# Altium PCB ISEPIC Cartridge for C64.PcbDoc
Units mm, origin at the board's own origin, x right, y up, seen from the top; angles counter-clockwise.
Board outline 61.22 x 83.18 mm, 2 copper layers (Top Layer, Bottom Layer), stack 1.569 mm thick; 23 components, 53 nets, 198 pads, 91 vias.
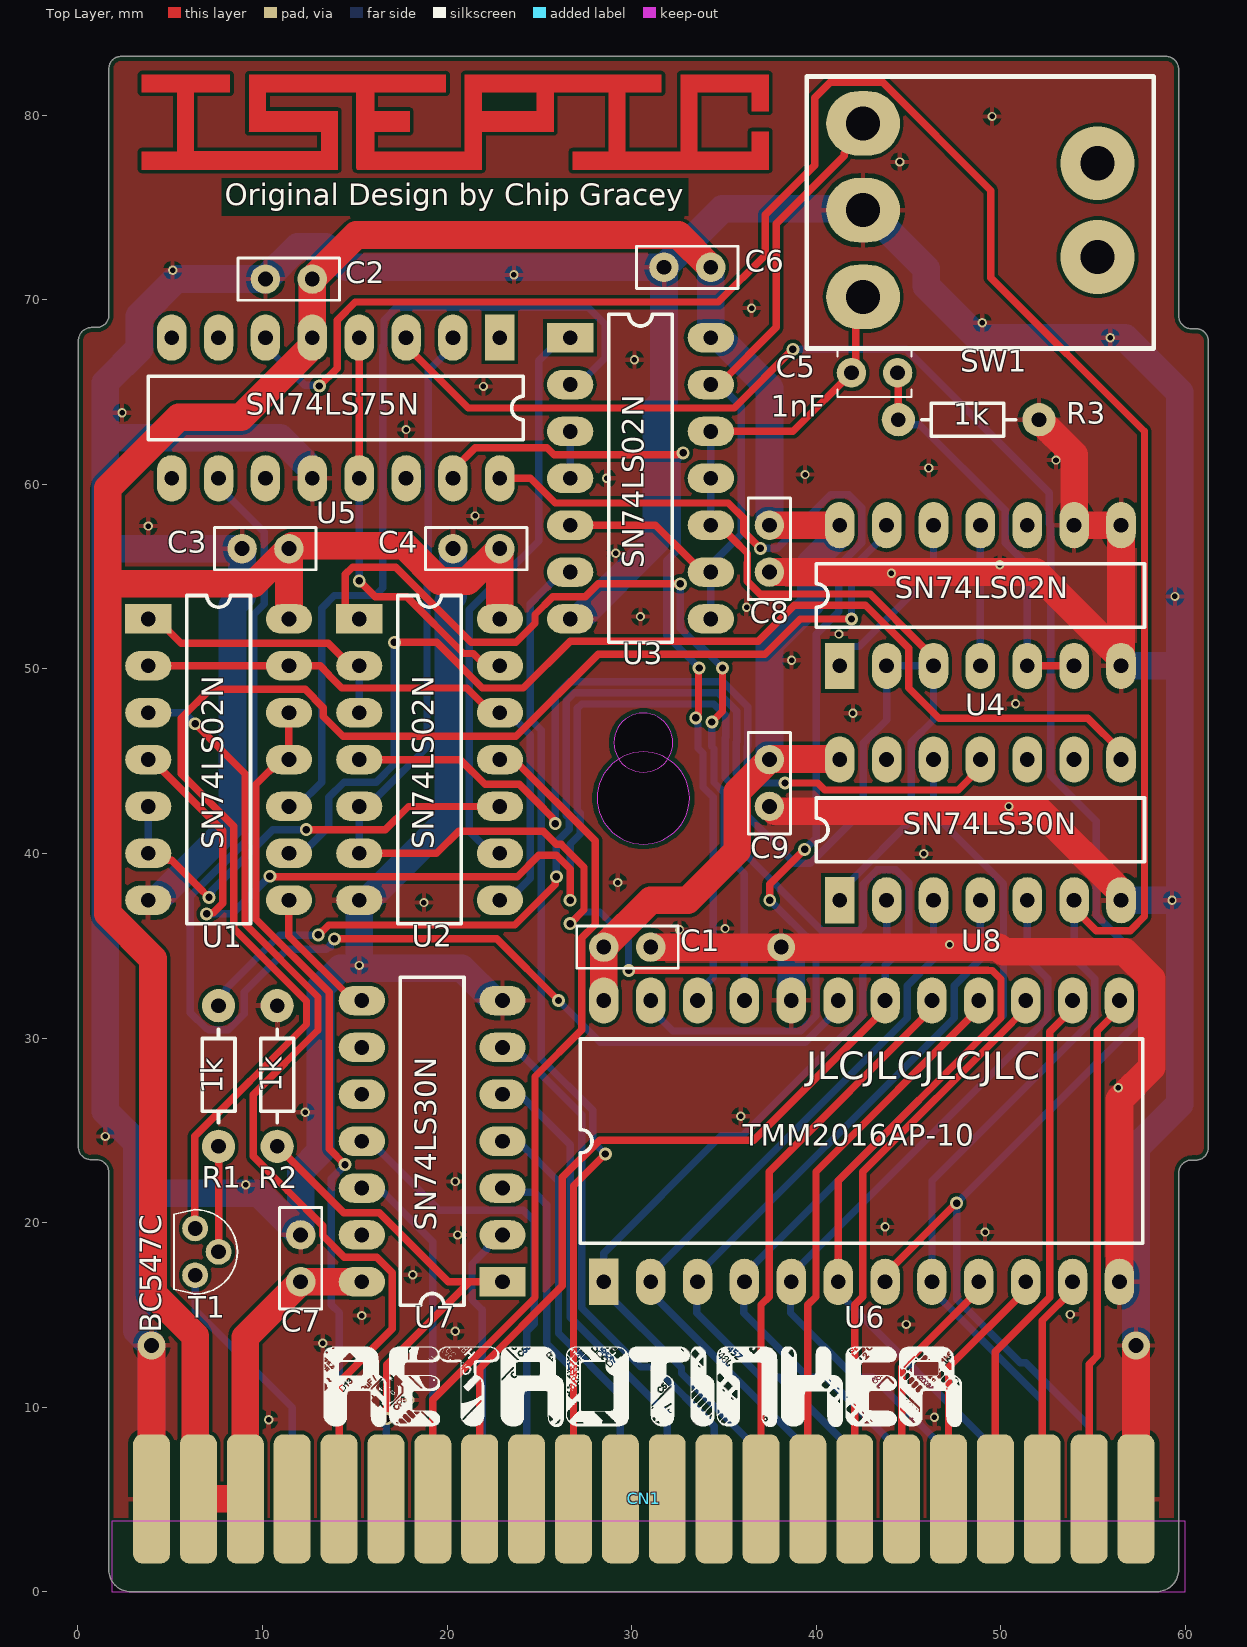
[diagram p0: Top Layer view]
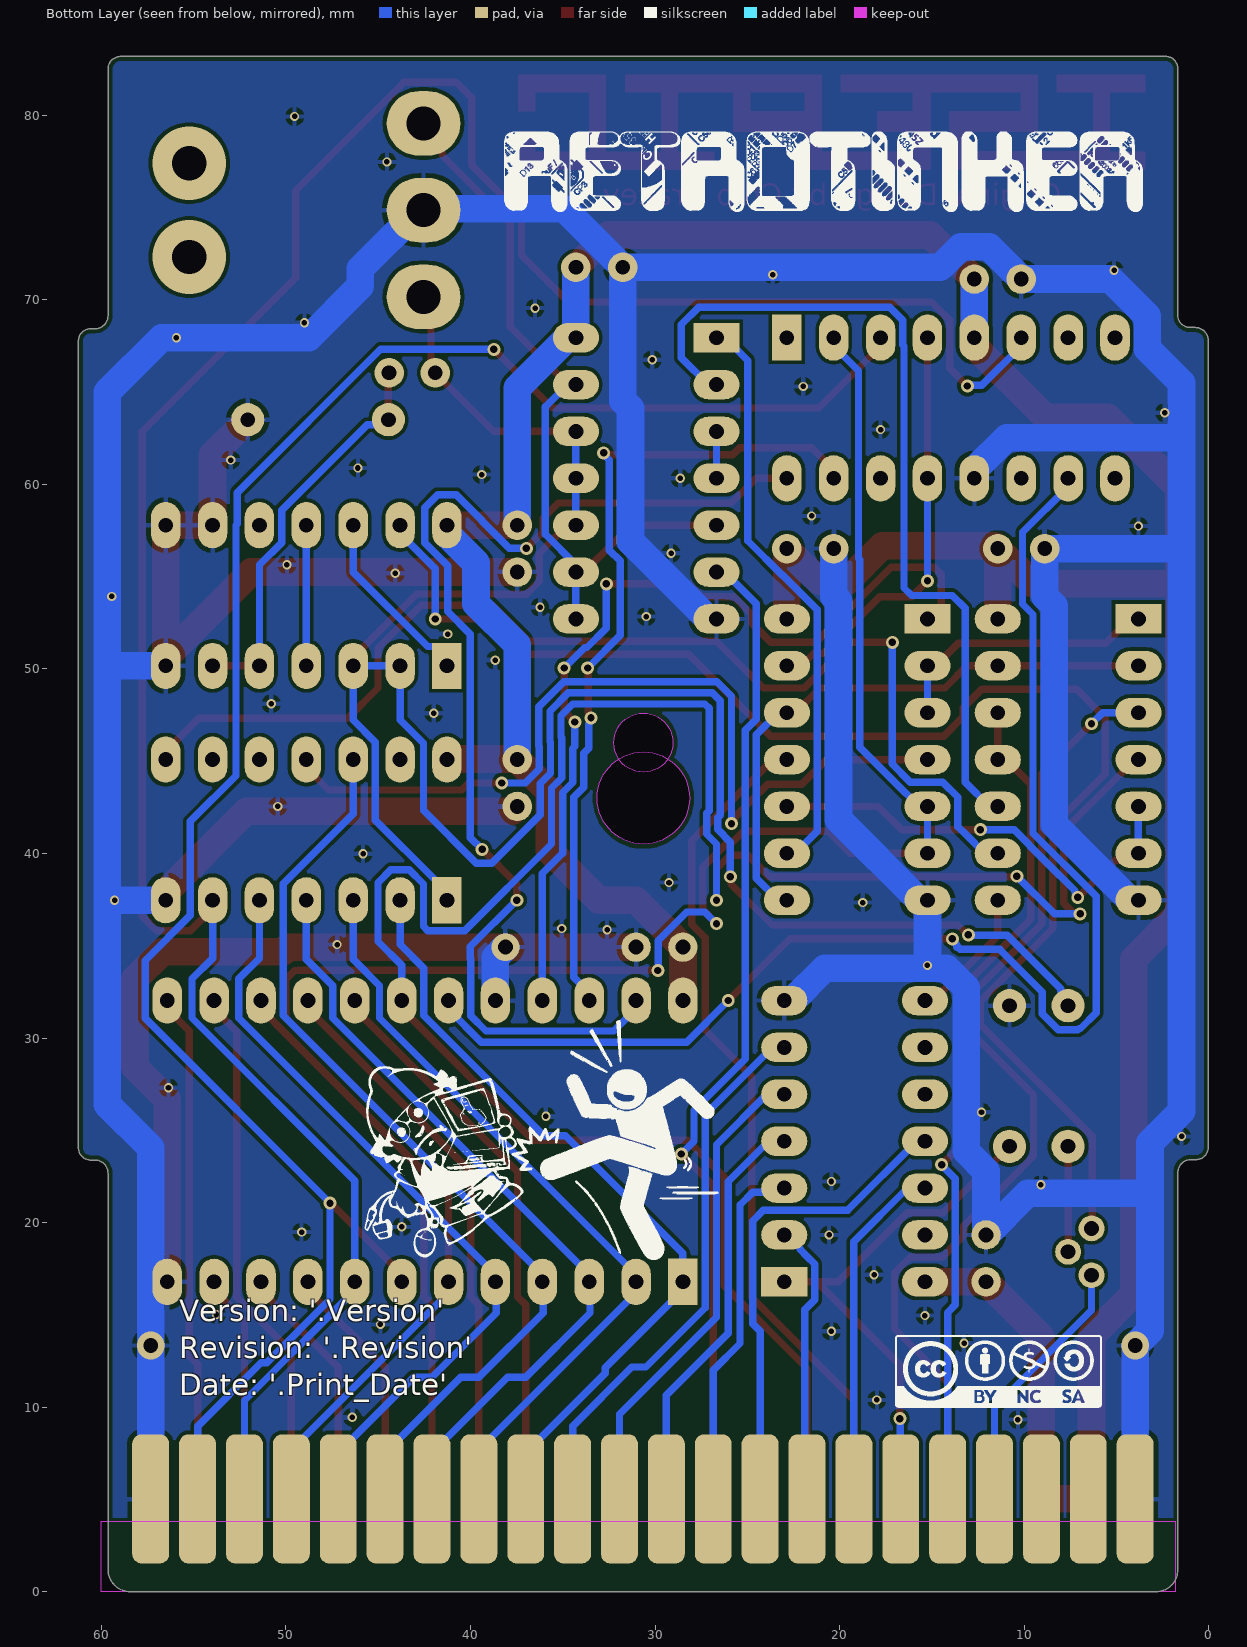
[diagram p1: Bottom Layer view, seen from below]
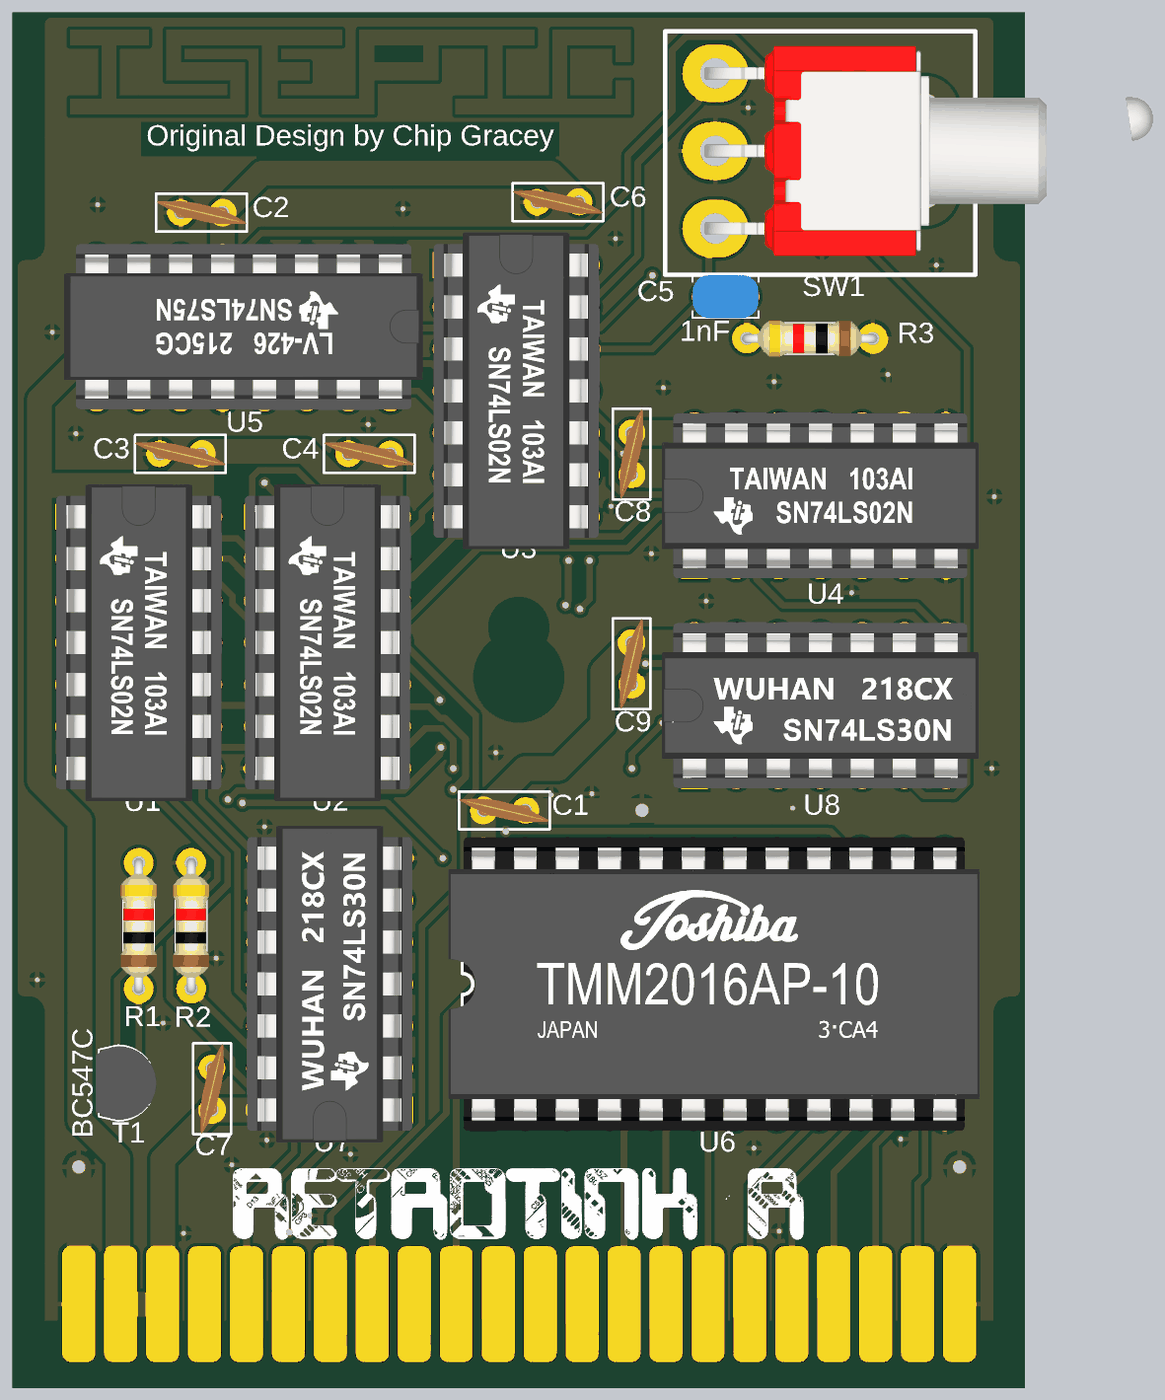
[diagram p2: 3D render of the assembled board from above, using the file's embedded part models]

## Layer stack, top to bottom
Top Solder: solder mask 0.0254, SM-001, Dk 4
Top Layer: signal copper 0.035
Dielectric 1: core 1.4986, Core-043, Dk 4.3
Bottom Layer: signal copper 0.035
Bottom Solder: solder mask 0.0254, SM-001, Dk 4

## Board outline
0.691,23.413 0.967,23.413 cw(c0.967,22.704) 1.676,22.704 1.676,1.173 ccw(c2.845,1.173) 2.845,0.005 58.446,0.005 ccw(c58.446,1.198) 59.639,1.198 59.639,22.678 cw(c60.348,22.678) 60.348,23.387 60.578,23.387 ccw(c60.578,24.054) 61.245,24.054 61.245,67.763 ccw(c60.578,67.763) 60.578,68.43 60.348,68.43 cw(c60.348,69.139) 59.639,69.139 59.639,82.499 ccw(c58.953,82.499) 58.953,83.185 2.337,83.185 ccw(c2.337,82.525) 1.676,82.525 1.676,69.164 cw(c1.01,69.164) 1.01,68.498 0.734,68.498 ccw(c0.734,67.789) 0.024,67.789 0.024,24.079 ccw(c0.691,24.079)
cut-out: 29.034,46.002 ccw(c30.635,46.002) 30.635,44.402 ccw(c30.635,46.002) 32.235,46.002 ccw(c30.635,46.002) 30.635,47.602 ccw(c30.635,46.002)
cut-out: 28.134,43.002 ccw(c30.635,43.002) 30.635,40.502 ccw(c30.635,43.002) 33.135,43.002 ccw(c30.635,43.002) 30.635,45.503 ccw(c30.635,43.002)

## Design rules (kind name [scope] priority, off if disabled: settings)
BoardOutlineClearance [All] p1: gap=0.254 ignorepadtopadclearanceinfootprint=FALSE
Clearance [All] p1: gap=0.2 ignorepadtopadclearanceinfootprint=TRUE
ComponentClearance ComponentClearance_Sheet [HasFootprint('PCB Title Block DIN A4')] p1: gap=0 collisioncheckmode=3 verticalgap=0 showdistances=FALSE
ComponentClearance [All] p2: gap=0.254 collisioncheckmode=3 verticalgap=0.254 showdistances=FALSE
MinimumSolderMaskSliver [All] p1: minsoldermaskwidth=0.103
PolygonConnect [All] p1: connectstyle=Relief reliefconductorwidth=0.254 reliefentries=4 polygonreliefangle="90 Angle" airgapwidth=0.254
RoutingVias RoutingVias_Power [(InNet('VCC') OR InNet('GND') OR InNet('+5V'))] p1: holewidth=0.8 width=1.5 viastyle="Through Hole" minholewidth=0.5 minwidth=1 maxholewidth=0.8 maxwidth=1.5
RoutingVias [All] p2: holewidth=0.4 width=0.7 viastyle="Through Hole" minholewidth=0.3 minwidth=0.6 maxholewidth=0.5 maxwidth=0.8
SilkToSilkClearance [All] p1: silktosilkclearance=0
SilkToSolderMaskClearance [IsPad] p1: minsilkscreentomaskgap=0.2 clearancetoexposedcopper=TRUE
SolderMaskExpansion [All] p1: expansion=0.038 istentingtop=FALSE
UnRoutedNet [All] p1: checkbadconnections=TRUE
Width Width_Power [(InNet('VCC') OR InNet('GND') OR InNet('+5V'))] p1: maxlimit=1.5 minlimit=1 preferedwidth=1.5
Width [All] p2: maxlimit=0.6 minlimit=0.3 preferedwidth=0.4
25 further rules are at their usual default settings.

## Classes and differential pairs
net class D[0..7]: D0 D1 D2 D3 D4 D5 D6 D7
net class A[0..15]: A0 A1 A2 A3 A4 A5 A6 A7 A8 A9 A10 A11 A12 A13 A14 A15

## Components (designator, comment, footprint, x,y, rotation, side; value= is the part's Value field where it differs from the comment)
C1 "100nF" "CAP Disc 100nF P2.54mm D5.5mm T3mm" 31.031,34.925 r180 top
C2 "100nF" "CAP Disc 100nF P2.54mm D5.5mm T3mm" 10.16,71.12 r0 top
C3 "100nF" "CAP Disc 100nF P2.54mm D5.5mm T3mm" 8.89,56.515 r0 top
C4 "100nF" "CAP Disc 100nF P2.54mm D5.5mm T3mm" 20.32,56.515 r0 top
C5 "1nF" K102J15C0GF5TL2 41.91,66.04 r0 top
C6 "100nF" "CAP Disc 100nF P2.54mm D5.5mm T3mm" 31.75,71.755 r0 top
C7 "100nF" "CAP Disc 100nF P2.54mm D5.5mm T3mm" 12.065,19.329 r270 top
C8 "100nF" "CAP Disc 100nF P2.54mm D5.5mm T3mm" 37.465,55.245 r90 top
C9 "100nF" "CAP Disc 100nF P2.54mm D5.5mm T3mm" 37.465,42.545 r90 top
CN1 "C64 Expansion Port" "C64 Expansion Port EDGE Connector" 3.988,5.029 r0 top locked
R1 "1k" "1,0 kOhm R Axial DIN0207 L6.3mm D2.5mm P7.62mm Horizontal" 7.62,24.13 r90 top
R2 "1k" "1,0 kOhm R Axial DIN0207 L6.3mm D2.5mm P7.62mm Horizontal" 10.795,24.13 r90 top
R3 "1k" "1,0 kOhm R Axial DIN0207 L6.3mm D2.5mm P7.62mm Horizontal" 52.07,63.5 r180 top
SW1 "100SP1T2B4M6QE" "Toogle Switch SPDT 100SP1T2B4M6QE" 42.542,79.554 r0 top
T1 "BC547C" BC547C 6.35,19.685 r270 top
U1 "SN74LS02N" "SN74LS02N with Socket" 3.81,52.705 r270 top
U2 "SN74LS02N" "SN74LS02N with Socket" 15.24,52.705 r270 top
U3 "SN74LS02N" "SN74LS02N with Socket" 26.67,67.945 r270 top
U4 "SN74LS02N" "SN74LS02N with Socket" 41.275,50.165 r0 top
U5 "SN74LS75N" "SN74LS75N with Socket" 22.86,67.945 r270 top
U6 "TMM2016AP-10" "Toshiba TMM2016AP-10 - with Socket" 28.491,16.789 r90 top
U7 "SN74LS30N" "SN74LS30N with Socket" 23,16.789 r90 top
U8 "SN74LS30N" "SN74LS30N with Socket" 41.275,37.465 r0 top

## Footprints (in the part's own frame and the unit in brackets; to place one, negate y for a bottom-side part, rotate by r counter-clockwise, add the part's x,y. Pads: shape width x height; smd on the part's side, far side on the other; paste and mask are expansions set on the pad)
"1,0 kOhm R Axial DIN0207 L6.3mm D2.5mm P7.62mm Horizontal" [mm]
  round 1.8 hole 0.8: 1(0,0) 2(7.62,0)
  silkscreen extent 1.27,-0.89 6.35,0.89, body extent -0.27,-1.14 7.9,1.14, height 2.44
BC547C [mm]
  round 1.4 hole 0.8: 1(0,0) 2(1.27,1.27) 3(2.54,0)
  silkscreen extent -1.02,-1.14 3.56,2.29, body extent -0.97,-1.34 3.51,2.35, height 7.52
"C64 Expansion Port EDGE Connector" [mm] "C64 Expansion Port EDGE Connector"
  rrect50% 2x7 smd paste-1: 1(0,0) 2(2.54,0) 3(5.08,0) 4(7.62,0) 5(10.16,0) 6(12.7,0) 7(15.24,0) 8(17.78,0) 9(20.32,0) 10(22.86,0) 11(25.4,0) 12(27.94,0) 13(30.48,0) 14(33.02,0) 15(35.56,0) 16(38.1,0) 17(40.64,0) 18(43.18,0) 19(45.72,0) 20(48.26,0) 21(50.8,0) 22(53.34,0)
  rrect50% 2x7 smd far side paste-1: A(0,0) B(2.54,0) C(5.08,0) D(7.62,0) E(10.16,0) F(12.7,0) H(15.24,0) J(17.78,0) K(20.32,0) L(22.86,0) M(25.4,0) N(27.94,0) P(30.48,0) R(33.02,0) S(35.56,0) T(38.1,0) U(40.64,0) V(43.18,0) W(45.72,0) X(48.26,0) Y(50.8,0) Z(53.34,0)
"CAP Disc 100nF P2.54mm D5.5mm T3mm" [mm]
  round 1.6 hole 0.8: 1(0,0) 2(2.54,0)
  silkscreen extent -1.49,-1.14 4.01,1.14, body extent -1.49,-0.73 4.01,0.73, height 5.87
K102J15C0GF5TL2 [mm] "1000pF ±5% 50V Ceramic Capacitor C0G, NP0 Radial"
  round 1.6 hole 0.8: 1(0,0) 2(2.5,0)
  silkscreen extent -0.75,-1.3 3.25,1.3, body extent -0.75,-1.3 3.25,1.3, height 5.5
"SN74LS02N with Socket" [mm]
  rect 1.6x2.5 hole 0.8: 1(0,0)
  oval 1.6x2.5 hole 0.8: 2(2.54,0) 3(5.08,0) 4(7.62,0) 5(10.16,0) 6(12.7,0) 7(15.24,0) 8(15.24,7.62) 9(12.7,7.62) 10(10.16,7.62) 11(7.62,7.62) 12(5.08,7.62) 13(2.54,7.62) 14(0,7.62)
  silkscreen extent -1.27,2.08 16.51,5.54, body extent -1.97,-1.19 17.21,8.86, height 7.91
"SN74LS30N with Socket" [mm]
  rect 1.6x2.5 hole 0.8: 1(0,0)
  oval 1.6x2.5 hole 0.8: 2(2.54,0) 3(5.08,0) 4(7.62,0) 5(10.16,0) 6(12.7,0) 7(15.24,0) 8(15.24,7.62) 9(12.7,7.62) 10(10.16,7.62) 11(7.62,7.62) 12(5.08,7.62) 13(2.54,7.62) 14(0,7.62)
  silkscreen extent -1.27,2.08 16.51,5.54, body extent -1.97,-1.19 17.21,8.86, height 7.91
"SN74LS75N with Socket" [mm] "Quad Latch"
  rect 2.5x1.6 hole 0.8: 1(0,0)
  oval 2.5x1.6 hole 0.8: 2(0,-2.54) 3(0,-5.08) 4(0,-7.62) 5(0,-10.16) 6(0,-12.7) 7(0,-15.24) 8(0,-17.78) 9(7.62,-17.78) 10(7.62,-15.24) 11(7.62,-12.7) 12(7.62,-10.16) 13(7.62,-7.62) 14(7.62,-5.08) 15(7.62,-2.54) 16(7.62,0)
  silkscreen extent 2.08,-19.05 5.54,1.27, body extent -1.27,-19.75 8.78,1.97, height 8.01
"Toogle Switch SPDT 100SP1T2B4M6QE" [mm] "Toggle Switch SPDT Through Hole, Right Angle"
  oval 4x3.5 hole 1.85: 1(0,0) 2(0,-4.7) 3(0,-9.4)
  silkscreen extent -3.05,-12.19 15.75,2.54, body extent -0.63,-11.05 26.5,1.65, height 7.16
"Toshiba TMM2016AP-10 - with Socket" [mm]
  rect 2.5x1.6 hole 0.8: 1(0,0)
  oval 2.5x1.6 hole 0.8: 2(0,-2.54) 3(0,-5.08) 4(0,-7.62) 5(0,-10.16) 6(0,-12.7) 7(0,-15.24) 8(0,-17.78) 9(0,-20.32) 10(0,-22.86) 11(0,-25.4) 12(0,-27.94) 13(15.24,-27.94) 14(15.24,-25.4) 15(15.24,-22.86) 16(15.24,-20.32) 17(15.24,-17.78) 18(15.24,-15.24) 19(15.24,-12.7) 20(15.24,-10.16) 21(15.24,-7.62) 22(15.24,-5.08) 23(15.24,-2.54) 24(15.24,0)
  silkscreen extent 2.08,-29.21 13.16,1.27, body extent -1.27,-30.06 16.51,2.12, height 8.38

## Part data
C1 C2 C3 C4 C6 C7 C8 C9: library part CMP-Capacitors-Ceramic_Capacitors-00007-4, "Ceramic Disc Capacitors 100nF -20%~+80% 50V Through Hole,P=2.54mm RoHS", ComponentLink1URL=https://lcsc.com/product-detail/Others_Dersonic-CC1H104ZA1PD3F5O3000_C353909.html
C5: library part CMP-Capacitors-Ceramic_Capacitors-00026-2, "CAP CER 1000PF 50V C0G/NP0 RAD", Case/Package=Dipped, Dielectric=C0G, Max Operating Temperature=125°C, Min Operating Temperature=-55°C, Package Quantity=1, Tolerance=5%, Voltage=50V, Capacitance=1nF, Depth=2.6mm, Height=4mm, Height - Seated (Max)=0.22inch, Lead Free="Lead Free", Lead Length=30mm, Lead Pitch=0.098inch, Lead/Base Style=Straight, Length=4mm, Mount="Through Hole,PCB", Packaging="Tape and Reel", Radiation Hardening=No, Termination=Radial, Voltage Rating=50V, Voltage Rating (DC)=50V, Width=0.098inch
CN1: library part CMP-Commodore-00008-4, "Expansion Port EDGE Connector for Interface Cards"
R1 R2 R3: library part CMP-Resistors-Yageo_THT_DIN_0207-00072-1, "RES 1K OHM 1/4W 5% AXIAL", Case/Package=Axial, Max Operating Temperature=155°C, Max Power Dissipation=250mW, Min Operating Temperature=-55°C, Package Quantity=200, Resistance=1kR, Temperature Coefficient=500ppm/°C, Tolerance=5%, Composition="Carbon Film", Lead Free="Lead Free", Length=0.248inch, Number of Terminations=2, Packaging=Bulk, Power Rating=250mW
SW1: library part CMP-Switches-00009-1, "SWITCH TOGGLE SPDT 5A 120V", Actuator Color=Chrome, Contact Resistance=100mR, Current Rating=5A, Max Operating Temperature=85°C, Max Voltage Rating (AC)=250V, Max Voltage Rating (DC)=28V, Min Operating Temperature=-30°C, Package Quantity=1, Voltage Rating (AC)=120V, Actuator Length=6.46mm, Actuator Material=Brass,Chrome, Actuator Type="Standard Round", Contact Material="Silver,Copper Alloy", Contact Plating=Silver, Electrical Life=40000Cycles, Housing Material="Stainless Steel", Illumination Type=Non-Illuminated,Illuminated, Lead Free="Lead Free", Length=12.7mm, Mount="Through Hole,Brackets", Orientation="Right Angle", Packaging=Bulk, RoHS Compliant=Yes, Series=100, Switch Function=On-On, Termination="PC Pin", Throw Configuration=SPDT, Voltage Rating (DC)=28V, Width=6.86mm
T1: library part CMP-Transistors-00002-3, "BC547C Diotec Bipolar NPN Transistor 45V", Case/Package=TO-92, Collector Base Voltage (VCBO)=50V, Collector Emitter Saturation Voltage=600mV, Collector Emitter Voltage (VCEO)=45V, Emitter Base Voltage (VEBO)=5V, Frequency=300MHz, Max Operating Temperature=150°C, Min Operating Temperature=-55°C, Power Dissipation=500mW, Mount="Through Hole", Number of Channels=1, Number of Elements=1, Number of Pins=3, Packaging="Tape and Reel", Polarity=NPN
U1 U2 U3 U4: library part CMP-ICs-74xx-series-00003-3, "IC GATE NOR 4CH 2-INP 14DIP", Case/Package=PDIP, High Level Output Current=-400uA, Low Level Output Current=8mA, Max Operating Temperature=70°C, Max Supply Voltage=5.25V, Min Operating Temperature=0°C, Min Supply Voltage=4.75V, Operating Supply Voltage=5V, Package Quantity=25, Quiescent Current=2.8mA, Contact Plating=Gold, Height=4.57mm, Lead Free="Lead Free", Length=19.3mm, Logic Function=NOR, Max Output Current=8mA, Mount="Through Hole", Number of Bits=4, Number of Circuits=4, Number of Elements=4, Number of Gates=4, Number of Input Lines=2, Number of Inputs=2, Number of Output Lines=1, Number of Outputs=1, Number of Pins=14, Output Current=8mA, Packaging=Rail/Tube, Propagation Delay=15ns, Radiation Hardening=No, REACH SVHC="No SVHC", Schmitt Trigger Input=No, Termination="Through Hole", Turn-On Delay Time=15ns, Weight=0.032734oz, Width=6.35mm
U5: library part CMP-ICs-74xx-series-00080-1, "Latch Transparent 4-CH D-Type 16-Pin PDIP Tube", Case/Package=PDIP, High Level Output Current=-400uA, Low Level Output Current=8mA, Max Operating Temperature=70°C, Max Supply Voltage=5.25V, Min Operating Temperature=0°C, Min Supply Voltage=4.75V, Nominal Supply Current=12mA, Operating Supply Voltage=5V, Package Quantity=25, Quiescent Current=6.3mA, Contact Plating=Gold, Height=4.57mm, Independent Circuits=4, Lead Free="Contains Lead", Length=19.3mm, Logic Function=D-Type,Latch, Mount="Through Hole", Number of Bits=4, Number of Circuits=2, Number of Elements=2, Number of Input Lines=4, Number of Output Lines=4, Number of Pins=16, Output Current=8mA, Packaging=Rail/Tube, Polarity=Non-Inverting, Propagation Delay=27ns, Radiation Hardening=No, REACH SVHC="No SVHC", Turn-On Delay Time=9ns, Weight=0.03357oz, Width=6.35mm
U6: library part CMP-ICs-Memory-00000-4, "Integrated Circuit Memory 2016/TMM2016AP10 TOSHIBA Static RAM memory prog. volatille KX8=2"
U7 U8: library part CMP-ICs-74xx-series-00029-2, "IC GATE NAND 1CH 8-INP 14DIP", Case/Package=PDIP, High Level Output Current=-16mA, Low Level Output Current=400uA, Max Operating Temperature=70°C, Max Output Current=8mA, Max Supply Voltage=5.25V, Min Operating Temperature=0°C, Min Supply Voltage=4.75V, Nominal Supply Current=100uA, Operating Supply Voltage=5V, Package Quantity=25, Contact Plating=Gold, Lead Free="Lead Free", Logic Function=NAND, Mount="Through Hole", Number of Bits=1, Number of Circuits=1, Number of Elements=1, Number of Gates=1, Number of Input Lines=8, Number of Inputs=8, Number of Output Lines=1, Number of Outputs=1, Number of Pins=14, Output Current=8mA, Packaging=Rail/Tube, Propagation Delay=20ns, Radiation Hardening=No, REACH SVHC="No SVHC", Termination="Through Hole", Turn-On Delay Time=22ns, Weight=0.032734oz

## Via types
v1: diameter 0.5, hole 0.3, Top Layer to Bottom Layer, tented both sides, 54 vias
v2: diameter 0.7, hole 0.4, Top Layer to Bottom Layer, tented both sides, 32 vias
v3: diameter 1.5, hole 0.8, Top Layer to Bottom Layer, tented both sides, 3 vias
v4: diameter 4, hole 1.85, Top Layer to Bottom Layer, 2 vias

## Nets (pads, with @x,y where several pads share a name; then routed paths per layer and width w, separated by ;. In a path a pad name is that pad's centre, name@x,y a point inside that pad or via, vN(x,y) a via of type N, cw(c..) or ccw(c..) an arc to the next point about the centre after c; other vN are vias at no path point)
A0: CN1.Y U5.3 U6.7 | length 111.5
  Top Layer w0.4: U5.3 17.78,67.495 21.14,64.135 35.56,64.135 v2(38.735,67.31) ; U6.7 43.731,17.208 47.58,21.056 v2(47.611,21.056)
  Bottom Layer w0.4: v2(38.735,67.31) 44.877,67.31 52.635,59.552 52.635,57.855 52.705,57.785 52.705,44.208 55.175,41.738 55.175,36.658 57.631,34.202 57.631,31.076 v2(47.611,21.056) 47.611,15.842 51.048,12.406 51.351,12.406 54.788,8.969 CN1.Y ; U6.7 U6.7@43.731,17.239
A1: CN1.X U5.6 U6.8 U8.6 | length 141.7
  Top Layer w0.4: v2(13.081,65.329) 14.04,66.288 14.04,68.892 15.023,69.875 34.696,69.875 37.236,72.415 37.236,74.6 39.929,77.292 39.929,80.939 40.769,81.78 43.607,81.78 49.465,75.921 49.465,75.365 49.465,71.185 57.785,62.865 57.785,36.588 57.012,35.815 55.175,35.815 53.975,37.015 U8.6
  Bottom Layer w0.4: U5.6 10.16,67.495 12.291,65.364 13.046,65.364 v2(13.081,65.329) ; CN1.X 52.248,10.357 47.011,15.594 47.011,15.599 46.271,16.339 46.271,22.262 55.091,31.082 55.091,33.213 53.975,34.33 U8.6
A2: CN1.W U2.5 U2.6 U5.2 U6.6 | length 108.6
  Top Layer w0.4: U2.6 19.426,40.005 20.626,41.205 25.207,41.205 25.913,40.499 26.176,40.499 27.42,39.255 27.42,36.945 v2(26.67,36.195) ; v2(29.845,33.655) 29.869,33.679 49.308,33.679 49.333,33.655 49.53,33.655 50.011,33.174 50.011,31.082 41.191,22.262 U6.6
  Bottom Layer w0.4: U2.6 U2.5 15.69,42.545 16.43,43.285 16.436,43.285 18.91,45.759 18.91,55.922 18.98,55.992 18.98,66.155 20.32,67.495 U5.2 ; v2(26.67,36.195) 27.305,36.83 28.283,36.83 29.831,35.282 29.831,33.669 v2(29.845,33.655) ; U6.6 41.191,16.193 49.708,7.676 CN1.W
A3: CN1.V U6.5 U8.5 | length 42.8
  Bottom Layer w0.4: CN1.V 47.168,7.529 43.075,11.622 42.086,11.622 38.608,15.099 38.608,16.746 U6.5 38.651,17.182 52.551,31.082 52.551,33.213 51.435,34.33 U8.5
A4: CN1.U U6.4 U8.12 | length 51.6
  Bottom Layer w0.4: CN1.U 44.628,7.529 40.535,11.622 39.546,11.622 36.068,15.099 36.068,16.746 U6.4 36.111,17.182 50.151,31.222 50.151,38.356 46.355,42.152 U8.12
A5: CN1.T U6.3 U8.4 | length 42.9
  Bottom Layer w0.4: CN1.T 42.088,7.529 37.995,11.622 37.006,11.622 33.528,15.099 33.528,16.746 U6.3 33.571,17.182 47.471,31.082 47.471,32.836 48.895,34.26 U8.4
A6: CN1.S U6.2 U8.3 | length 42.3
  Bottom Layer w0.4: CN1.S 39.548,7.676 31.031,16.193 U6.2 31.031,17.182 44.931,31.082 44.931,32.836 46.355,34.26 U8.3
A7: CN1.R U6.1 U8.2 | length 43
  Bottom Layer w0.4: CN1.R 37.008,7.529 32.702,11.835 32.702,12.129 28.491,16.339 U6.1 28.491,18.345 34.86,24.714 36.023,24.714 42.531,31.222 42.531,33.781 43.815,35.065 U8.2
A8: CN1.P U7.6 | length 29.5
  Bottom Layer w0.4: U7.6@23.495,29.489 23.637,29.489 27.291,25.835 27.291,15.374 30.493,12.171 31.266,12.171 34.468,8.969 CN1.P
A9: CN1.N U7.5 | length 25.7
  Bottom Layer w0.4: U7.5@23.495,26.949 23.945,26.949 26.67,24.224 26.67,14.878 31.928,9.621 CN1.N
A10: CN1.M U7.4 | length 22
  Bottom Layer w0.4: U7.4@23.495,24.409 23.851,24.409 26.035,22.225 26.035,13.999 29.388,10.646 CN1.M
A11: CN1.L U7.3 | length 18.8
  Bottom Layer w0.4: U7.3@23.495,21.869 23.725,21.64 24.715,21.64 25.4,20.955 25.4,13.45 26.848,12.002 CN1.L
A12: CN1.K U7.11 | length 26.4
  Bottom Layer w0.4: U7.11 15.83,24.409 19.57,20.669 24.131,20.669 24.715,20.086 24.715,14.517 24.308,14.109 CN1.K
A13: CN1.J U7.2 | length 15.4
  Bottom Layer w0.4: CN1.J 21.896,5.157 21.896,15.278 21.35,15.824 21.35,17.755 21.775,18.18 22.147,18.552 22.147,18.602 22.875,19.329 U7.2@23.045,19.329
A14: CN1.H U7.12 | length 18.5
  Bottom Layer w0.4: U7.12@15.875,21.869 16.325,21.869 19.228,18.967 CN1.H
A15: CN1.F R2.1 U7.1 | length 28.9
  Top Layer w0.4: R2.1 14.396,20.529 16.327,20.529 20.067,16.789 21.234,16.789 ; v2(16.739,9.373) 16.739,12.294 21.234,16.789 ; U7.1 21.234,16.789
  Bottom Layer w0.4: CN1.F 16.713,5.055 16.713,9.347 v2(16.739,9.373)
D0: CN1.21 U6.13 | length 27.7
  Top Layer w0.4: CN1.21 54.788,12.326 55.231,12.77 55.231,30.379 56.431,31.579 U6.13
D1: CN1.20 U6.11 | length 12.4
  Top Layer w0.4: CN1.20 52.248,14.69 53.891,16.334 U6.11
D2: CN1.19 U6.14 | length 28.7
  Top Layer w0.4: CN1.19 49.708,12.999 52.656,15.947 52.656,30.344 53.891,31.579 U6.14
D3: CN1.18 U6.10 | length 13.5
  Top Layer w0.4: CN1.18 47.168,12.156 51.351,16.339 U6.10
D4: CN1.17 U6.9 | length 13.5
  Top Layer w0.4: CN1.17 44.628,12.156 48.811,16.339 U6.9
D5: CN1.16 U6.15 | length 30.8
  Top Layer w0.4: CN1.16 42.088,15.539 42.531,15.982 42.531,22.754 50.611,30.834 50.611,30.839 51.351,31.579 U6.15
D6: CN1.15 U6.16 | length 30.8
  Top Layer w0.4: CN1.15 39.548,15.539 39.991,15.982 39.991,22.759 48.811,31.579 U6.16
D7: CN1.14 U6.17 | length 30.8
  Top Layer w0.4: CN1.14 37.008,15.539 37.451,15.982 37.451,22.759 46.271,31.579 U6.17
GND: C1.1 C2.1 C3.1 C4.1 C6.1 C7.1 C8.1 C9.1 CN1.1 CN1.22 CN1.A CN1.Z R2.2 R3.1 SW1.2 U1.7 U2.7 U3.7 U4.7 U4.8 U4.9 U5.12 U6.12 U6.20 U7.7 U8.7 | length 444.8
  Top Layer w1.5: CN1.1 v3(3.988,13.335) ; C1.1 49.886,34.925 50.146,34.665 56.72,34.665 58.181,33.204 58.181,28.42 56.431,26.67 U6.12 ; C9.1 37.492,42.545 37.752,42.285 50.444,42.285 52.145,42.285 56.515,37.915 U8.7 ; C8.1 51.885,55.245 U4.7@56.515,50.615 ; R3.1 53.975,61.595 U4.9 U4.8 U4.7@56.515,50.615 ; U4.7 U4.7@56.515,50.615 ; CN1.22 v3(57.328,13.335)
  Bottom Layer w1.5: U1.7 4.26,37.465 8.375,41.58 8.375,53.423 8.89,53.938 C3.1 8.375,56.515 1.475,56.515 ; CN1.A v3(3.988,13.335) 3.188,14.134 3.188,21.59 ; U5.12 12.7,60.775 10.95,62.525 1.77,62.525 1.475,62.23 ; C4.1 20.32,53.938 20.06,53.678 20.06,41.835 15.69,37.465 U2.7 v1(15.24,33.934) 15.24,33.919 v1@15.38,33.779 ; U7.7 22.55,32.029 20.8,33.779 v1@15.38,33.779 ; U3.7 27.12,52.705 31.328,56.913 31.328,64.11 31.75,64.531 C6.1 ; v3(38.1,34.925) 38.651,34.374 U6.20 ; U6.12 57.328,16.789 ; U8.7 v1(59.284,37.465) 59.69,37.465 ; U4.7 59.69,50.165 ; CN1.Z v3(57.328,13.335) 57.328,16.789 ; 1.475,56.515 1.475,62.23 ; 1.475,56.515 1.475,26.035 3.188,24.322 3.188,21.59 ; 1.475,62.23 1.475,65.509 3.33,67.363 3.33,69.12 5.33,71.12 C2.1 11.91,72.87 13.425,72.87 14.54,71.755 23.622,71.755 C6.1 ; 3.188,21.59 9.804,21.59 C7.1 12.065,22.784 13.145,23.864 13.145,32.719 14.205,33.779 v1@15.38,33.779 ; C6.1 34.925,74.93 42.466,74.93 SW1.2 42.792,74.854 45.97,71.676 45.97,70.74 48.765,67.945 v1(55.931,67.945) 56.734,67.945 59.69,64.989 59.69,53.924 59.69,50.165 ; 57.328,16.789 57.328,24.054 59.69,26.416 59.69,37.465 ; 59.69,37.465 59.69,50.165
  other v1: 10.338,9.322 46.406,9.449 17.983,10.389 13.259,13.462 20.447,14.109 44.882,14.478 15.38,14.959 53.764,15.019 18.136,17.17 20.574,19.329 49.149,19.482 43.731,19.767 9.093,22.047 20.447,22.225 1.475,24.668 35.916,25.756 12.313,25.975 56.363,27.305 47.228,35.065 32.597,35.861 35.062,35.929 18.745,37.338 29.245,38.423 45.822,39.98 50.444,42.545 41.988,47.6 50.8,48.108 38.665,50.47 41.229,51.885 30.477,52.832 36.228,53.34 59.436,53.924 44.076,55.178 49.947,55.638 29.134,56.261 3.81,57.734 21.52,58.289 28.641,60.325 39.395,60.528 46.101,60.884 52.993,61.316 17.78,62.967 2.388,63.881 21.971,65.303 30.15,66.751 48.997,68.758 36.5,69.545 23.622,71.349 5.131,71.603 44.526,77.47 49.53,79.934
"Latch Enable": U2.13 U5.4 U5.13 | length 22.7
  Top Layer w0.4: v2(15.24,54.765) 16.1,53.905 17.821,53.905 20.891,50.835 21.415,50.835 22.085,50.165 U2.13 ; U5.13 U5.4
  Bottom Layer w0.4: v2(15.24,54.765) U5.13
N\M\I\: CN1.D T1.3 | length 14.3
  Bottom Layer w0.4: T1.3 6.35,15.24 11.608,9.982 CN1.D
NetC5_1: C5.1 R1.2 SW1.3 U3.10 U3.11 U3.12 U4.2 U4.3 U8.1 | length 116.3
  Top Layer w0.4: v2(13.021,35.59) 13.05,35.59 13.584,36.125 23.667,36.125 25.863,38.321 25.863,38.679 v2(25.92,38.736) ; U3.10 34.74,57.785 35.48,57.045 35.486,57.045 36.278,56.252 36.278,55.755 36.265,55.742 36.265,54.748 36.968,54.045 38.556,54.045 38.566,54.055 42.921,54.055 45.615,51.361 45.615,51.355 46.355,50.615 U4.3 ; U3.12 38.735,62.865 42.14,66.27 42.14,69.751 SW1.3
  Bottom Layer w0.4: R1.2 7.62,32.129 8.027,32.535 8.027,32.665 10.922,35.56 12.991,35.56 v2(13.021,35.59) ; v2(25.92,38.736) 25.92,40.612 26.61,41.302 26.61,41.924 26.46,42.074 26.46,48.264 26.895,48.698 34.7,48.698 35.694,47.705 35.694,46.055 35.665,46.027 35.665,44.339 36.212,43.792 36.212,42.101 38.844,39.469 39.681,39.469 42.545,42.333 42.545,45.962 43.815,47.232 U4.2 U4.3 46.355,47.232 45.155,46.032 45.155,41.801 41.945,38.591 41.945,38.585 41.275,37.915 U8.1 ; U3.10 U3.11 U3.12
NetC5_2: C5.2 R3.2 U4.5 U4.6 | length 21.8
  Top Layer w0.4: R3.2 C5.2@44.45,66.04 ; U4.5 U4.6
  Bottom Layer w0.4: R3.2 44.718,63.232 45.595,63.232 50.235,58.592 50.235,56.838 51.435,55.638 U4.5
NetCN1_5: CN1.5 U1.3 | length 54.3
  Top Layer w0.4: v2(6.35,47.025) 9.048,44.327 9.048,36.184 13.009,32.223 13.009,30.43 9.495,26.916 9.495,23.592 11.378,21.709 11.382,21.709 13.265,19.826 13.265,19.297 14.433,18.129 16.187,18.129 17.03,17.286 17.03,14.238 14.148,11.355 CN1.5
  Bottom Layer w0.4: U1.3 5.75,47.625 v2(6.35,47.025)
NetCN1_7: CN1.7 U2.11 | length 46.3
  Top Layer w0.4: CN1.7 19.228,10.402 24.765,15.939 24.765,27.914 27.291,30.441 27.291,35.422 28.02,36.151 28.02,40.689 23.624,45.085 U2.11
NetCN1_8: CN1.8 U1.4 U6.18 | length 122.2
  Top Layer w0.4: U1.4 3.986,45.085 5,44.071 7.848,41.223 7.848,37.306 7.325,36.783 7.027,36.783 v2(6.97,36.725) ; v2(10.398,38.763) 10.425,38.736 23.812,38.736 24.975,39.899 25.928,39.899 26.67,39.156 v2(26.67,37.465) ; CN1.8 21.768,12.093 26.248,16.573 26.248,22.449 28.264,24.465 36.617,24.465 43.731,31.579 U6.18
  Bottom Layer w0.4: v2(6.97,36.725) 8.36,36.725 v2(10.398,38.763) ; v2(26.67,37.465) 26.67,40.514 27.21,41.054 27.21,42.172 27.06,42.322 27.06,47.864 27.294,48.098 34.452,48.098 35.094,47.456 35.094,46.304 35.065,46.275 35.065,44.091 35.612,43.544 35.612,40.512 40.309,35.815 42.311,35.815 42.545,36.049 42.545,38.342 43.318,39.115 44.312,39.115 45.015,38.412 45.015,35.226 43.731,33.943 U6.18
NetCN1_10: CN1.10 U3.6 | length 53.8
  Top Layer w0.4: CN1.10 26.848,21.988 v2(28.575,23.715)
  Bottom Layer w0.4: U3.6 26.22,55.245 24.51,53.535 24.51,47.274 25.11,46.674 25.11,28.865 27.891,26.084 27.891,24.399 v2(28.575,23.715)
NetCN1_E: CN1.E U1.11 U1.12 | length 46.1
  Top Layer w0.4: U1.12 U1.11 10.98,45.085 9.648,43.753 9.648,36.432 13.609,32.472 13.609,24.003 v2(14.472,23.139)
  Bottom Layer w0.4: CN1.E 14.148,15.128 13.73,15.545 13.73,22.366 14.472,23.109 v2(14.472,23.139)
NetR1_1: R1.1 T1.2 | length 5.7
  Top Layer w0.4: T1.2 R1.1
NetSW1_1: SW1.1 U3.5 U3.8 U3.9 U3.13 | length 40.8
  Top Layer w0.4: U3.5 31.294,57.785 33.094,55.985 33.1,55.985 33.84,55.245 U3.9 ; U3.13 34.74,65.405 37.836,68.501 37.836,74.124 41.518,77.805 41.518,77.94 42.542,78.965 SW1.1
  Bottom Layer w0.4: U3.8 U3.9 34.29,55.638 35.94,57.288 35.94,64.205 34.74,65.405 U3.13
NetT1_1: T1.1 U4.13 | length 79.8
  Top Layer w0.4: T1.1 6.32,19.715 6.32,24.668 12.383,30.732 12.383,32 8.448,35.935 8.448,41.472 5.6,44.32 5.6,47.336 7.159,48.895 12.307,48.895 13.3,47.902 13.3,47.418 14.363,46.355 23.737,46.355 28.182,50.8 37.228,50.8 39.133,52.705 v2(41.91,52.705)
  Bottom Layer w0.4: v2(41.91,52.705) 41.91,55.424 43.075,56.589 43.075,56.595 43.815,57.335 U4.13
NetU1_1: U1.1 U2.2 U2.3 | length 15
  Top Layer w0.4: U1.1 4.26,52.705 5.581,51.384 13.571,51.384 14.79,50.165 U2.2
  Bottom Layer w0.4: U2.3 U2.2
NetU1_2: U1.2 U1.13 U2.8 U2.12 | length 32.2
  Top Layer w0.4: U1.2 13.12,50.165 13.59,49.695 13.59,49.668 14.293,48.965 21.064,48.965 22.404,47.625 U2.12
  Bottom Layer w0.4: U2.8 23.31,37.465 24.51,38.665 24.51,46.425 23.31,47.625 U2.12
NetU1_5: U1.5 U1.6 U2.10 | length 24.8
  Top Layer w0.4: U1.6 4.585,40.005 4.95,39.64 5.075,39.64 6.51,38.205 v2(7.098,37.616) ; v2(12.372,41.288) 12.384,41.275 16.643,41.275 17.913,42.545 U2.10
  Bottom Layer w0.4: U1.6 U1.5 ; v2(7.098,37.616) 7.098,37.697 7.248,37.847 7.248,37.978 8.85,39.58 10.545,41.275 12.359,41.275 v2(12.372,41.288)
NetU1_8: U1.8 U7.8 | length 7.3
  Top Layer w0.4: U1.8 11.43,35.529 14.93,32.029 U7.8
NetU1_9: U1.9 U8.8 | length 62.5
  Top Layer w0.4: v2(17.145,51.435) 19.443,51.435 21.913,48.965 24.13,48.965 26.67,51.505 36.865,51.505 38.815,53.455 42.672,53.455 45.015,51.112 45.015,48.965 46.65,47.33 54.72,47.33 56.515,45.535 U8.8
  Bottom Layer w0.4: U1.9 12.15,40.005 13.122,40.977 13.59,41.445 13.59,43.042 14.414,43.866 16.168,43.866 17.145,44.843 v2(17.145,51.435)
NetU1_10: U1.10 U3.2 | length 47
  Bottom Layer w0.4: U1.10 11.88,42.545 13.201,43.866 13.201,53.282 13.894,53.975 16.1,53.975 16.51,54.385 16.51,67.495 16.58,67.565 16.58,68.892 17.283,69.595 27.636,69.595 28.575,68.656 28.575,66.86 27.12,65.405 U3.2
NetU2_1: U2.1 U6.21 | length 49.8
  Top Layer w0.4: U2.1 15.09,52.705 14.49,53.305 14.49,55.13 14.875,55.515 17.219,55.515 21.299,51.435 23.737,51.435 24.765,52.463 24.765,52.947 25.723,53.905 27.477,53.905 28.182,54.61 v2(32.64,54.61) ; v2(34.344,47.124) 34.925,47.705 v2(34.925,50.048)
  Bottom Layer w0.4: U2.1 15.69,52.705 15.782,52.613 U2.1@15.782,52.797 ; v2(32.64,54.61) 32.64,53.34 32.64,52.208 33.691,51.157 33.816,51.157 v2(34.925,50.048) ; v2(34.344,47.124) 34.344,45.806 34.465,45.685 34.465,43.842 35.012,43.295 35.012,40.013 36.111,38.914 U6.21
NetU2_4: U2.4 U8.11 | length 47.8
  Top Layer w0.4: U2.4 20.713,45.085 22.053,43.745 23.903,43.745 24.853,42.795 25.71,41.938 25.71,41.844 25.86,41.694 v2(25.86,41.613) ; v2(38.308,43.815) 40.086,43.815 40.466,43.435 47.695,43.435 48.895,44.635 U8.11
  Bottom Layer w0.4: v2(25.86,41.613) 25.86,48.512 26.646,49.298 34.949,49.298 36.294,47.953 36.294,45.807 36.265,45.778 36.265,44.588 37.038,43.815 v2(38.308,43.815)
NetU2_9: U2.9 U3.1 | length 31.4
  Bottom Layer w0.4: U2.9 22.41,40.005 21.21,41.205 21.21,53.202 23.072,55.064 23.106,55.064 24.968,56.926 24.968,66.693 26.22,67.945 U3.1
NetU3_3: U3.3 U3.4 | length 2.5
  Bottom Layer w0.4: U3.4 U3.3
NetU4_1: U4.1 U4.12 | length 10
  Bottom Layer w0.4: U4.1 41.275,50.614 41.875,51.214 42.324,51.214 46.355,55.245 U4.12
NetU4_4: U4.4 U4.11 | length 7.6
  Bottom Layer w0.4: U4.4 U4.11
Q1: U5.16 U6.23 | length 64
  Top Layer w0.4: U5.16 24.523,60.325 25.863,58.985 35.237,58.985 36.07,58.152 36.07,57.433 v2(36.976,56.527) ; v2(37.484,37.465) 37.484,38.333 v2(39.37,40.219)
  Bottom Layer w0.4: U6.23 31.031,31.579 32.231,30.379 39.162,30.379 39.991,31.209 39.991,34.297 40.005,34.311 40.005,34.954 v2@37.489,37.47 ; v2(36.976,56.527) 37.904,56.527 39.369,57.992 39.369,58.027 40.778,59.435 41.772,59.435 42.475,58.732 42.475,56.838 41.229,55.592 41.229,53.109 40.005,51.885 40.005,40.854 v2(39.37,40.219)
Q2: U5.15 U6.22 | length 45.2
  Top Layer w0.4: U5.15 20.32,60.775 21.52,61.975 25.413,61.975 25.793,61.595 32.468,61.595 32.52,61.647 32.733,61.647 v2(32.79,61.704) ; v2(33.472,47.348) 33.472,47.429 33.624,47.582 33.624,50.019 v2(33.655,50.05)
  Bottom Layer w0.4: v2(32.79,61.704) 32.79,61.632 32.478,61.32 32.478,56.437 31.89,55.849 31.89,51.815 v2(33.655,50.05) ; v2(33.472,47.348) 33.529,47.291 33.529,47.079 33.594,47.014 33.594,45.708 33.865,45.436 33.865,43.594 34.412,43.047 34.412,33.287 33.571,32.446 U6.22
Q3: U5.10 U6.19 | length 73.5
  Top Layer w0.4: v2(13.895,35.375) 22.689,35.375 v2(26.035,32.029)
  Bottom Layer w0.4: U5.10 7.62,59.875 10.09,57.405 10.09,53.512 9.525,52.947 9.525,41.104 6.094,37.673 6.094,31.371 6.952,30.513 7.018,30.513 7.082,30.45 8.158,30.45 9.017,31.309 9.017,32.493 11.334,34.81 13.455,34.81 13.57,34.925 13.661,34.925 13.661,35.06 13.895,35.294 v2(13.895,35.375) ; v2(26.035,32.029) 28.285,29.779 39.411,29.779 41.191,31.56 U6.19
VCC: C1.2 C2.2 C3.2 C4.2 C6.2 C7.2 C8.2 C9.2 CN1.2 CN1.3 U1.14 U2.14 U3.14 U4.14 U5.5 U6.24 U7.14 U8.14 | length 206.7
  Top Layer w1.5: U1.14 C3.2 ; U7.14 C7.2 9.068,13.792 CN1.3 CN1.2 6.35,5.207 6.35,13.856 4.064,16.142 4.064,34.286 1.61,36.74 1.61,54.61 ; U2.14 C4.2 21.11,54.765 19.595,54.765 17.695,56.665 11.607,56.665 11.457,56.515 C3.2 ; U6.24 C1.2 31.031,37.465 33.039,37.465 35.715,40.141 35.715,43.335 37.484,45.104 37.563,45.104 37.574,45.115 41.229,45.115 41.259,45.085 U8.14 ; C6.2 32.54,73.505 15.085,73.505 C2.2 12.7,67.495 8.833,63.628 5.458,63.628 1.61,59.78 1.61,54.61 ; C8.2 U4.14 ; 1.61,54.61 9.525,54.61 C3.2
  Bottom Layer w1.5: U5.5 C2.2 ; C6.2 U3.14 34.74,67.945 37.465,65.22 C8.2 ; C9.2 37.465,51.301 39.7,53.536 39.7,55.733 41.275,57.308 U4.14
pads on no net: CN1.4 CN1.6 CN1.9 CN1.11 CN1.12 CN1.13 CN1.B CN1.C U4.10 U5.1 U5.7 U5.8 U5.9 U5.11 U5.14 U7.9 U7.10 U7.13 U8.9 U8.10 U8.13
copper on no net:
  other v4: 55.242,72.314 55.242,77.394

## Polygon pours and split planes (outlines as drawn)
GND on Top Layer "Top Layer - GND" (solid, remove dead copper, pour order 2): 0.691,23.413 0.967,23.413 cw(c0.967,22.704) 1.676,22.704 1.676,1.173 ccw(c2.845,1.173) 2.845,0.005 58.446,0.005 ccw(c58.446,1.198) 59.639,1.198 59.639,22.678 cw(c60.348,22.678) 60.348,23.387 60.578,23.387 ccw(c60.578,24.054) 61.245,24.054 61.245,67.763 ccw(c60.578,67.763) 60.578,68.43 60.348,68.43 cw(c60.348,69.139) 59.639,69.139 59.639,82.499 ccw(c58.953,82.499) 58.953,83.185 2.337,83.185 ccw(c2.337,82.525) 1.676,82.525 1.676,69.164 cw(c1.01,69.164) 1.01,68.498 0.734,68.498 ccw(c0.734,67.789) 0.024,67.789 0.024,24.079 ccw(c0.691,24.079)
GND on Bottom Layer "Bottom Layer - GND" (solid, remove dead copper, pour order 3): 0.691,23.413 0.967,23.413 cw(c0.967,22.704) 1.676,22.704 1.676,1.173 ccw(c2.845,1.173) 2.845,0.005 58.446,0.005 ccw(c58.446,1.198) 59.639,1.198 59.639,22.678 cw(c60.348,22.678) 60.348,23.387 60.578,23.387 ccw(c60.578,24.054) 61.245,24.054 61.245,67.763 ccw(c60.578,67.763) 60.578,68.43 60.348,68.43 cw(c60.348,69.139) 59.639,69.139 59.639,82.499 ccw(c58.953,82.499) 58.953,83.185 2.337,83.185 ccw(c2.337,82.525) 1.676,82.525 1.676,69.164 cw(c1.01,69.164) 1.01,68.498 0.734,68.498 ccw(c0.734,67.789) 0.024,67.789 0.024,24.079 ccw(c0.691,24.079)

## Keep-outs
Keep-Out Layer:
  rectangle: 1.829,0.005 59.995,3.815

## Other copper
Top Layer:
  region: 25.778,81.246 25.774,81.242 25.774,79.111 21.886,79.111 21.883,79.107 21.869,79.121 21.869,80.219 24.852,80.219 24.855,80.222 24.855,81.246
  region: 3.453,82.191 8.236,82.191 8.236,81.246 6.264,81.246 6.264,78.033 13.175,78.033 13.178,78.03 13.182,78.033 13.182,79.111 9.263,79.111 9.273,79.121 9.273,82.188 19.934,82.188 19.937,82.191 19.937,81.246 16.046,81.246 16.046,80.219 17.965,80.219 17.965,79.111 16.049,79.111 16.046,79.107 16.046,78.03 20.964,78.03 20.964,82.191 31.601,82.191 31.611,82.181 31.611,81.246 29.669,81.246 29.666,81.242 29.666,78.03 32.665,78.03 32.665,82.191 37.421,82.191 37.421,80.219 36.502,80.219 36.502,81.246 33.557,81.246 33.557,78.03 36.502,78.03 36.502,79.111 37.421,79.111 37.421,77.057 26.804,77.057 26.801,77.06 26.801,78.03 28.772,78.03 28.767,78.035 28.767,81.246 25.778,81.246 21.886,81.246 21.886,79.111 21.883,79.107 21.883,77.057 15.127,77.057 15.07,77.115 15.07,81.246 10.182,81.246 10.182,80.219 14.073,80.219 14.065,80.21 14.065,77.057 3.453,77.057 3.453,78.03 5.369,78.03 5.372,78.033 5.369,78.037 5.369,81.246 3.453,81.246
  text "Original Design by Chip Gracey" at 7.957,74.726 h2

## Silkscreen, mask and mechanical layers (free items; w line width, h text height)
Top Overlay:
  drawing of 35 lines, arcs and shapes, not listed
  text "Original Design by Chip Gracey" at 7.957,74.726 h2
  text "JLCJLCJLCJLC" at 39.465,27.778 h1.5
Bottom Overlay:
  drawing of 106 lines, arcs and shapes, not listed
  text "Version: '.Version' / Revision: '.Revision' / Date: '.Print_Date'" at 55.778,10.247 h2
Board:
  circle w0.1: c30.635,46.002 r1.6
  circle w0.1: c30.635,43.002 r2.501
  lines w0.1: 0.024,24.079 ccw(c0.691,24.079) 0.691,23.413 0.967,23.413 cw(c0.967,22.704) 1.676,22.704 1.676,1.173 ccw(c2.845,1.173) 2.845,0.005 58.446,0.005 ccw(c58.446,1.198) 59.639,1.198 59.639,22.678 cw(c60.348,22.678) 60.348,23.387 60.578,23.387 ccw(c60.578,24.054) 61.245,24.054 61.245,67.763 ccw(c60.578,67.763) 60.578,68.43 60.348,68.43 cw(c60.348,69.139) 59.639,69.139 59.639,82.499 ccw(c58.953,82.499) 58.953,83.185 2.337,83.185 ccw(c2.337,82.525) 1.676,82.525 1.676,69.164 cw(c1.01,69.164) 1.01,68.498 0.734,68.498 ccw(c0.734,67.789) 0.024,67.789 0.024,24.079